# Altium PCB PCB1.pcbdoc
Units mil, origin at the board's own origin, x right, y up, seen from the top; angles counter-clockwise.
Board outline 5257.68 x 6780 mil, 2 copper layers (Top Layer, Bottom Layer), stack 62.206 mil thick; 51 components, 52 nets, 242 pads, 96 vias.
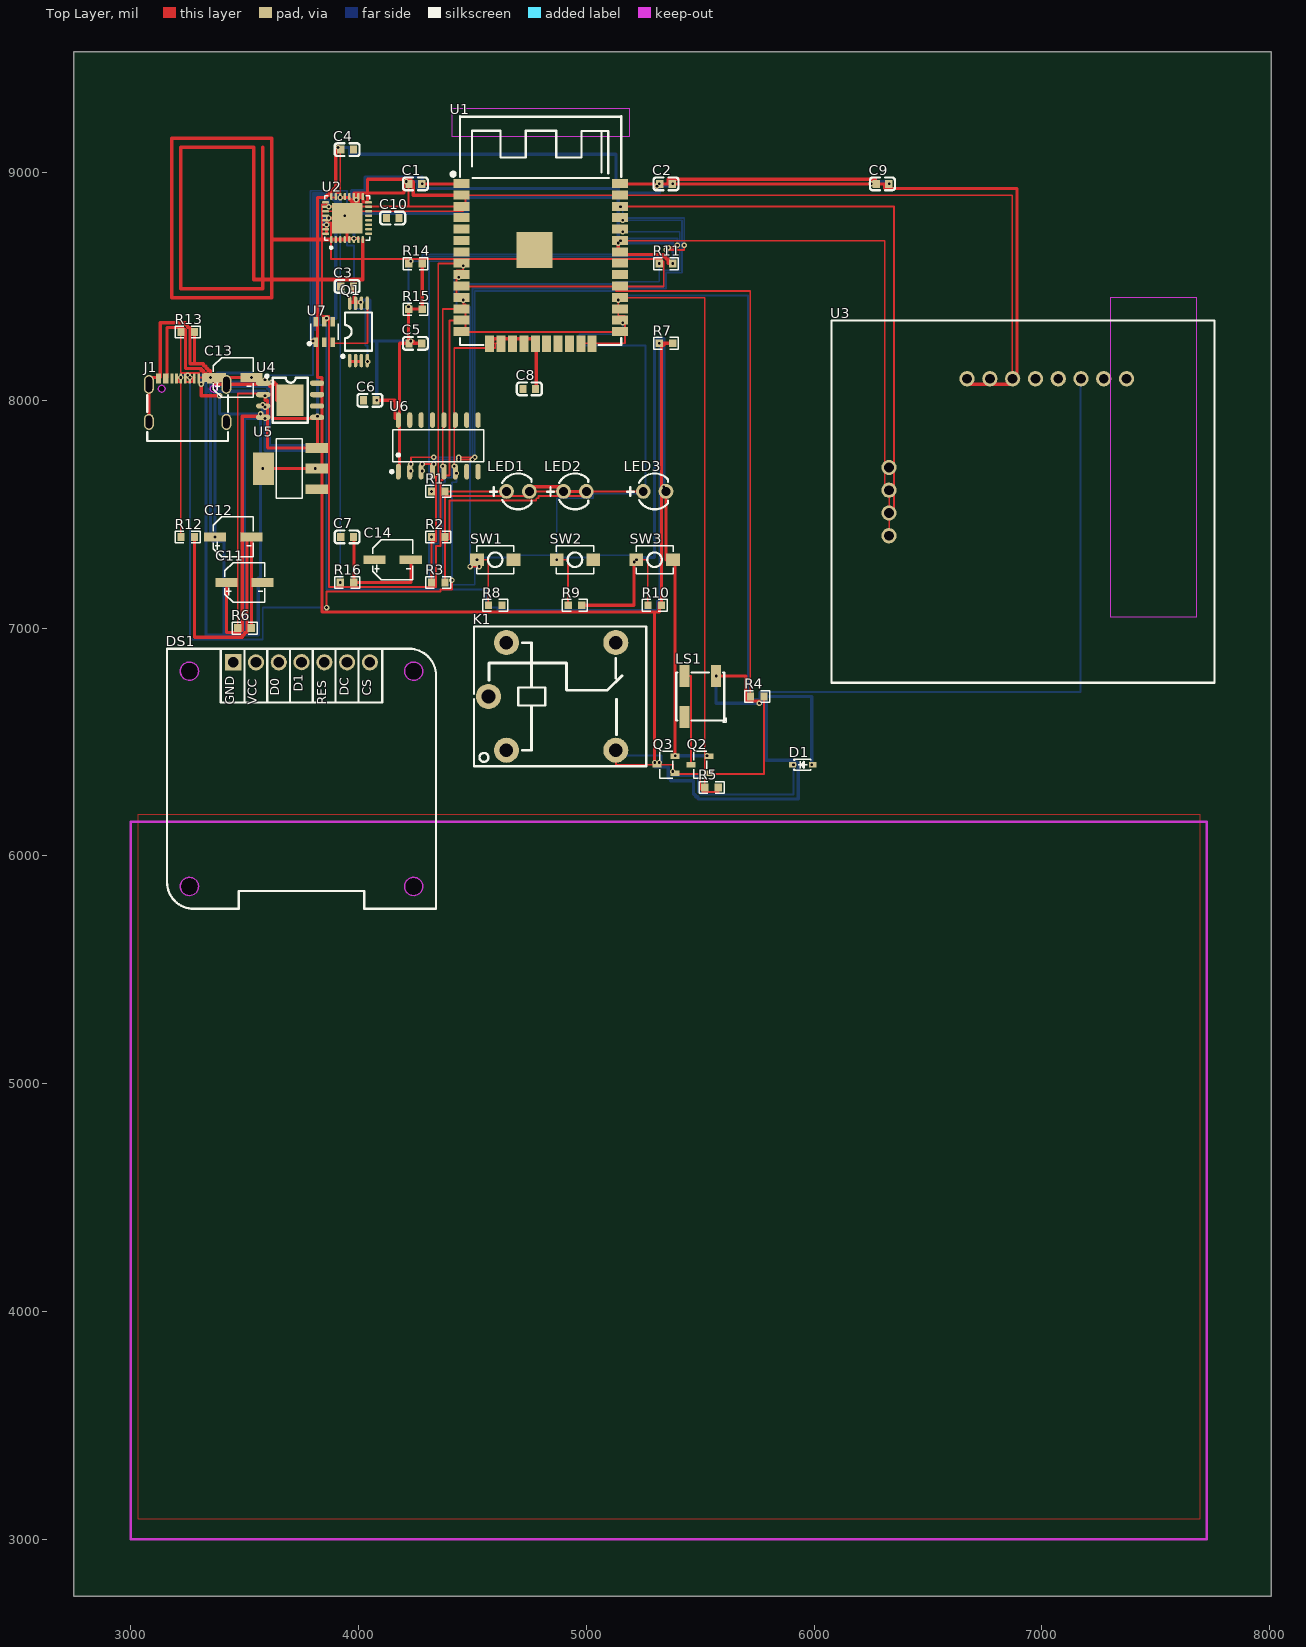
[diagram p0: Top Layer view]
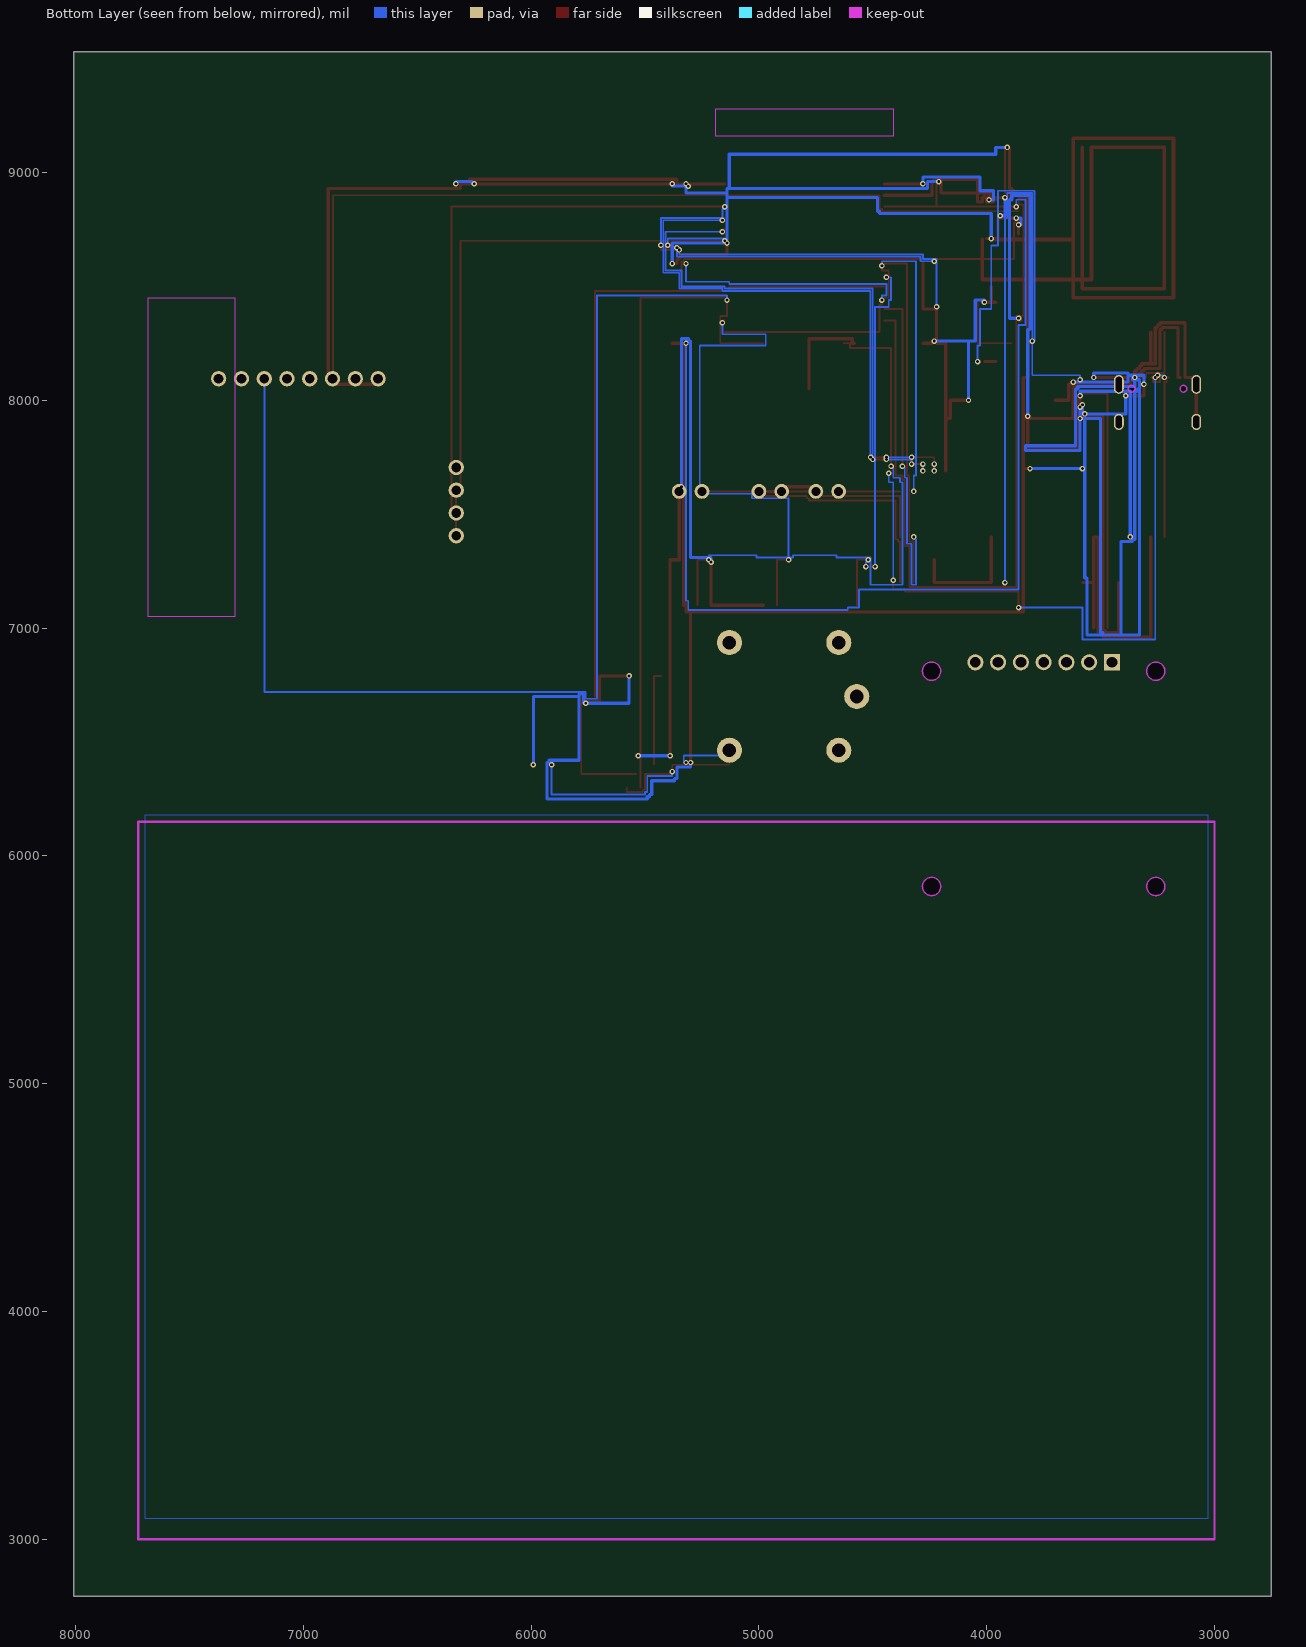
[diagram p1: Bottom Layer view, seen from below]

## Layer stack, top to bottom
Top Solder Mask Layer: solder mask 0.394, Dk 3.3
Top Layer: signal copper 1.379
Dielectric1: surface 59.449, FR4, Dk 4.5
Bottom Layer: signal copper 1.378
Bottom Solder Mask Layer: solder mask 0.394, Dk 3.3

## Board outline
8007.68,2750 2750,2750 2750,9530 8007.68,9530

## Design rules (kind name [scope] priority, off if disabled: settings)
BoardOutlineClearance copperThickness2oz_1 [All] p2 off: genericclearance=7.99 ignorepadtopadclearanceinfootprint=FALSE except(0: Arc-SplitContinuation Track-SplitContinuation SMDPad-SplitContinuation THPad-SplitContinuation Via-SplitContinuation Fill-SplitContinuation Region-SplitContinuation Poly-SplitContinuation Text-SplitContinuation Hole-SplitContinuation; 5.98: Arc-CutoutEdge SMDPad-CutoutEdge THPad-CutoutEdge Via-CutoutEdge Fill-CutoutEdge Region-CutoutEdge Text-CutoutEdge; 6.93: Hole-OutlineEdge Hole-CutoutEdge; 10: Poly-OutlineEdge Poly-CutoutEdge; 11.81: Arc-OutlineEdge Track-OutlineEdge SMDPad-OutlineEdge THPad-OutlineEdge Via-OutlineEdge Fill-OutlineEdge Region-OutlineEdge Text-OutlineEdge Track-CutoutEdge)
BoardOutlineClearance copperThickness1oz_1 [All] p4: genericclearance=4.02 ignorepadtopadclearanceinfootprint=FALSE except(0: Arc-SplitContinuation Track-SplitContinuation SMDPad-SplitContinuation THPad-SplitContinuation Via-SplitContinuation Fill-SplitContinuation Region-SplitContinuation Poly-SplitContinuation Text-SplitContinuation Hole-SplitContinuation; 6: SMDPad-CutoutEdge THPad-CutoutEdge Via-CutoutEdge Fill-CutoutEdge Region-CutoutEdge Text-CutoutEdge; 6.93: Hole-OutlineEdge Hole-CutoutEdge; 10: Poly-OutlineEdge Poly-CutoutEdge; 11.8: Arc-OutlineEdge Track-OutlineEdge SMDPad-OutlineEdge THPad-OutlineEdge Via-OutlineEdge Fill-OutlineEdge Region-OutlineEdge Text-OutlineEdge; 11.81: Arc-CutoutEdge Track-CutoutEdge)
Clearance copperThickness2oz [All] p1 off: gap=7.99 ignorepadtopadclearanceinfootprint=FALSE except(5.98: SMDPad-Track SMDPad-SMDPad THPad-Track SMDPad-THPad THPad-THPad Track-Via SMDPad-Via THPad-Via Via-Via Fill-Track Region-Track Fill-SMDPad Region-SMDPad Fill-THPad Region-THPad Fill-Via Region-Via Fill-Fill Fill-Region Region-Region Arc-Track Arc-SMDPad Arc-THPad Arc-Via Fill-Arc Region-Arc Arc-Arc Text-Track SMDPad-Text Text-THPad Text-Via Fill-Text Region-Text Arc-Text Text-Text; 6.93: Hole-Track Hole-SMDPad Hole-THPad Hole-Via Fill-Hole Region-Hole Hole-Arc Hole-Text; 10: Poly-Track Poly-SMDPad Poly-THPad Poly-Via Poly-Fill Poly-Region Poly-Poly Poly-Arc Poly-Text Poly-Hole)
Clearance copperThickness1oz [All] p3: gap=4.02 ignorepadtopadclearanceinfootprint=FALSE except(5.98: SMDPad-Track SMDPad-SMDPad THPad-Track SMDPad-THPad THPad-THPad Track-Via SMDPad-Via THPad-Via Via-Via Fill-Track Region-Track Fill-SMDPad Region-SMDPad Fill-THPad Region-THPad Fill-Via Region-Via Fill-Fill Fill-Region Region-Region; 6: Arc-Track Arc-SMDPad Arc-THPad Arc-Via Fill-Arc Region-Arc Arc-Arc Text-Track SMDPad-Text Text-THPad Text-Via Fill-Text Region-Text Arc-Text Text-Text; 6.93: Hole-Track Hole-SMDPad Hole-THPad Hole-Via Fill-Hole Region-Hole Hole-Arc Hole-Text; 10: Poly-Track Poly-SMDPad Poly-THPad Poly-Via Poly-Fill Poly-Region Poly-Poly Poly-Arc Poly-Text Poly-Hole)
Creepage creepage [All] p1: checkdistance=0 ignoreinternallayers=TRUE applytopolygonpour=TRUE
DiffPairsRouting differentialPair [All] p1: maxlimit=6 minlimit=6 mostfreqgap=6 toplayer_minwidth=5 toplayer_prefwidth=10 toplayer_maxwidth=100 toplayer_mingap=6 toplayer_prefgap=6 toplayer_maxgap=6 bottomlayer_minwidth=5 bottomlayer_prefwidth=10 bottomlayer_maxwidth=100 bottomlayer_mingap=6 bottomlayer_prefgap=6 bottomlayer_maxgap=6 maxuncoupledlength=10
HoleToHoleClearance otherClearance [All] p1: gap=11.81 allowstackedmicrovias=TRUE
Length netLength [All] p1: minlimit=0 maxlimit=0
MatchedLengths netLengthTolerance [All] p1: tolerance=1000
PasteMaskExpansion pasteMaskExpansion [All] p1: expansion=0
PlaneConnect innerPlane [All] p1: planeconnectstyle=Relief reliefexpansion=20 reliefentries=4 reliefconductorwidth=10 reliefairgap=10
PolygonConnect copperRegion [All] p1: connectstyle=Relief reliefconductorwidth=10 reliefentries=4 polygonreliefangle="90 Angle" airgapwidth=10 via.connectstyle=Relief via.reliefconductorwidth=10 via.reliefentries=4 via.polygonreliefangle="90 Angle" via.airgapwidth=10
RoutingVias viaSize [All] p1: holewidth=12.01 width=24.02 viastyle="Through Hole" minholewidth=11.81 minwidth=19.68 maxholewidth=248.03 maxwidth=393.7
SolderMaskExpansion solderMaskExpansion [IsVia] p1: expansion=-1000 istentingtop=TRUE
SolderMaskExpansion solderMaskExpansion [All] p2: expansion=2 istentingtop=FALSE
Width copperThickness2oz_2 [All] p1 off: maxlimit=100 minlimit=8 preferedwidth=10
Width copperThickness1oz_2 [All] p2: maxlimit=100 minlimit=5 preferedwidth=10

## Components (designator, comment, footprint, x,y, rotation, side; value= is the part's Value field where it differs from the comment)
C1 "100nF" C0603 4250,8950 r0 top
C2 "100nF" C0603 5350,8950 r0 top
C3 "100nF" C0603 3950,8500 r0 top
C4 "100nF" C0603 3950,9100 r0 top
C5 "100nF" C0603 4250,8250 r0 top
C6 "100nF" C0603 4050,8000 r0 top
C7 "100nF" C0603 3950,7400 r0 top
C8 "100nF" C0603 4750,8050 r0 top
C9 "100nF" C0603 6300,8950 r0 top
C10 "15pF" C0603 4150,8800 r0 top
C11 "CAP-SMD 4*5 10uF ±10% 16V" CAP-SMD_BD4.0-L4.3-W4.3-LS5.3-FD 3500,7200 r0 top
C12 "CAP-SMD 4*5 10uF ±10% 16V" CAP-SMD_BD4.0-L4.3-W4.3-LS5.3-FD 3450,7400 r0 top
C13 "CAP-SMD 4*5 10uF ±10% 16V" CAP-SMD_BD4.0-L4.3-W4.3-LS5.3-FD 3450,8100 r0 top
C14 "CAP-SMD 4*5 10uF ±10% 16V" CAP-SMD_BD4.0-L4.3-W4.3-LS5.3-FD 4150,7300 r0 top
D1 "SS14" SOD-323_L1.7-W1.3-LS2.6-RD-1 5950,6400 r0 top
DS1 "JX040102-1" OLED-TH_JX040101-1 3750,6850 r0 top
J1 "UCB11L69P16" TYPE-C-SMD_16P-UCB11L69P16 3250,8000 r0 top
K1 "SRD-03VDC-SL-C" RELAY-TH_SRD-XXVDC-XL-C 4850,6700 r0 top
LED1 "LED" LED-TH_BD4.0-P2.54-FD_RED 4700,7600 r0 top
LED2 "LED" LED-TH_BD4.0-P2.54-FD_RED 4950,7600 r0 top
LED3 "LED" LED-TH_BD4.0-P2.54-FD_RED 5300,7600 r0 top
LS1 "BEEP_SMT" BUZ-SMD_3P-L5.2-W5.2-P3.50-BR 5500,6700 r0 top
Q1 "FS8205A" TSSOP-8_L4.4-W3.0-P0.65-LS6.4-BL-2 4000,8300 r0 top
Q2 "S8050" SOT-23-3_L2.9-W1.3-P1.90-LS2.4-BR 5500,6400 r0 top
Q3 "S8050" SOT-23-3_L2.9-W1.3-P1.90-LS2.4-BR 5350,6400 r0 top
R1 "1k" R0603 4350,7600 r0 top
R2 "1k" R0603 4350,7400 r0 top
R3 "1k" R0603 4350,7200 r0 top
R4 "1k" R0603 5750,6700 r0 top
R5 "1k" R0603 5550,6300 r0 top
R6 "10k" R0603 3500,7000 r0 top
R7 "10k" R0603 5350,8250 r0 top
R8 "10k" R0603 4600,7100 r0 top
R9 "10k" R0603 4950,7100 r0 top
R10 "10k" R0603 5300,7100 r0 top
R11 "10k" R0603 5350,8600 r0 top
R12 "5.1k" R0603 3250,7400 r0 top
R13 "5.1k" R0603 3250,8300 r0 top
R14 "10k" R0603 4250,8600 r0 top
R15 "10k" R0603 4250,8400 r0 top
R16 "10k" R0603 3950,7200 r0 top
SW1 "轻触按键3*4*H" SW-SMD_L4.0-W2.9-LS5.0 4600,7300 r0 top
SW2 "轻触按键3*4*H" SW-SMD_L4.0-W2.9-LS5.0 4950,7300 r0 top
SW3 "轻触按键3*4*H" SW-SMD_L4.0-W2.9-LS5.0 5300,7300 r0 top
U1 "ESP32-WROOM-32" WIFIM-SMD_ESP-WROOM-32 4800,8600 r0 top
U2 "13.56MHz" QFN-32_L5.0-W5.0-P0.50-BL-EP3.4 3950,8800 r0 top
U3 "PN532 NFC RFID Module v4" COMM-TH_L42.7-W40.4_PN532_NFC_RFID 6850,7750 r0 top
U4 "TP4056X-42-ESOP8" SOP-8_L4.9-W3.9-P1.27-LS6.0-TL-EP 3700,8000 r0 top
U5 "AMS1117-3.3V" SOT-223-3_L6.5-W3.4-P2.30-LS7.0-BR 3700,7700 r0 top
U6 "CH340C" SOP-16_L10.0-W3.9-P1.27-LS6.0-BL 4350,7800 r0 top
U7 "DW01" SOT-23-6_L2.9-W1.6-P0.95-LS2.8-BL 3850,8300 r0 top

## Footprints (in the part's own frame and the unit in brackets; to place one, negate y for a bottom-side part, rotate by r counter-clockwise, add the part's x,y. Pads: shape width x height; smd on the part's side, far side on the other; paste and mask are expansions set on the pad)
BUZ-SMD_3P-L5.2-W5.2-P3.50-BR [mm]
  rect 1.12x2.425 smd: 1(1.75,2.288) 2(-1.75,2.288) 3(-1.75,-2.288)
  silkscreen extent -2.68,-2.9 2.9,2.68
C0603 [mm]
  rect 0.8x0.9 smd: 1(-0.7,0) 2(0.7,0)
  silkscreen extent -1.39,-0.71 1.39,0.71
CAP-SMD_BD4.0-L4.3-W4.3-LS5.3-FD [mm]
  rect 2.46x0.98 smd: 1(-2.02,0) 2(2.02,0)
  silkscreen extent -2.23,-2.23 2.23,2.23
COMM-TH_L42.7-W40.4_PN532_NFC_RFID [mm]
  round 1.7 hole 1.1: 1(-4.535,8.755) 2(-1.995,8.755) 3(0.545,8.755) 4(3.085,8.755) 5(5.625,8.755) 6(8.165,8.755) 7(10.705,8.755) 8(13.245,8.755) 9(-13.245,-1.135) 10(-13.245,-3.675) 11(-13.245,-6.215) 12(-13.245,-8.755)
  silkscreen extent -19.64,-25.14 23.05,15.25
LED-TH_BD4.0-P2.54-FD_RED [mil]
  round 65 hole 39.37: 1(-50,0) 2(50,0)
  silkscreen extent -122,-79 59,79
OLED-TH_JX040101-1 [mm]
  rect 1.8x1.8 hole 1.2 paste+0 mask+0.05: 1(-7.619,0.001)
  round 1.8 hole 1.2 paste+0 mask+0.05: 2(-5.079,-0.004) 3(-2.539,-0.004) 4(0.001,0.004) 5(2.539,-0.001) 6(5.079,-0.001) 7(7.619,-0.004)
  Board Outline Layer circle w0.003: c-12.501,-24.997 r1.016
  Board Outline Layer circle w0.003: c12.498,-24.997 r1.016
  Board Outline Layer circle w0.003: c12.498,-0.997 r1.016
  Board Outline Layer circle w0.003: c-12.501,-0.997 r1.016
  Board Outline Layer region: -11.485,-24.997 -11.585,-25.438 -11.867,-25.792 -12.275,-25.988 -12.727,-25.988 -13.134,-25.792 -13.416,-25.438 -13.517,-24.997 -13.517,-24.997 -13.416,-24.557 -13.134,-24.203 -12.727,-24.007 -12.275,-24.007 -11.867,-24.203 -11.585,-24.557 -11.485,-24.997
  Board Outline Layer region: -11.485,-24.997 -11.494,-25.136 -11.522,-25.272 -11.569,-25.402 -11.633,-25.525 -11.712,-25.639 -11.807,-25.74 -11.915,-25.827 -12.033,-25.9 -12.16,-25.955 -12.294,-25.992 -12.431,-26.011 -12.57,-26.011 -12.707,-25.992 -12.841,-25.955 -12.968,-25.9 -13.087,-25.827 -13.194,-25.74 -13.289,-25.639 -13.369,-25.525 -13.432,-25.402 -13.479,-25.272 -13.507,-25.136 -13.517,-24.997 -13.507,-24.859 -13.479,-24.723 -13.432,-24.593 -13.369,-24.47 -13.289,-24.356 -13.194,-24.255 -13.087,-24.167 -12.968,-24.095 -12.841,-24.04 -12.707,-24.003 -12.57,-23.984 -12.431,-23.984 -12.294,-24.003 -12.16,-24.04 -12.033,-24.095 -11.915,-24.167 -11.807,-24.255 -11.712,-24.356 -11.633,-24.47 -11.569,-24.593 -11.522,-24.723 -11.494,-24.859
  Board Outline Layer region: 13.514,-24.997 13.413,-25.438 13.132,-25.792 12.724,-25.988 12.272,-25.988 11.865,-25.792 11.583,-25.438 11.482,-24.997 11.482,-24.997 11.583,-24.557 11.865,-24.203 12.272,-24.007 12.724,-24.007 13.132,-24.203 13.413,-24.557 13.514,-24.997
  Board Outline Layer region: 13.514,-24.997 13.505,-25.136 13.476,-25.272 13.43,-25.402 13.366,-25.525 13.286,-25.639 13.192,-25.74 13.084,-25.827 12.965,-25.9 12.838,-25.955 12.705,-25.992 12.567,-26.011 12.429,-26.011 12.291,-25.992 12.158,-25.955 12.031,-25.9 11.912,-25.827 11.805,-25.74 11.71,-25.639 11.63,-25.525 11.566,-25.402 11.52,-25.272 11.492,-25.136 11.482,-24.997 11.492,-24.859 11.52,-24.723 11.566,-24.593 11.63,-24.47 11.71,-24.356 11.805,-24.255 11.912,-24.167 12.031,-24.095 12.158,-24.04 12.291,-24.003 12.429,-23.984 12.567,-23.984 12.705,-24.003 12.838,-24.04 12.965,-24.095 13.084,-24.167 13.192,-24.255 13.286,-24.356 13.366,-24.47 13.43,-24.593 13.476,-24.723 13.505,-24.859
  Board Outline Layer region: 13.514,-0.997 13.413,-1.438 13.132,-1.791 12.724,-1.987 12.272,-1.987 11.865,-1.791 11.583,-1.438 11.482,-0.997 11.482,-0.997 11.583,-0.556 11.865,-0.203 12.272,-0.006 12.724,-0.006 13.132,-0.203 13.413,-0.556 13.514,-0.997
  Board Outline Layer region: 13.514,-0.997 13.505,-1.135 13.476,-1.271 13.43,-1.402 13.366,-1.525 13.286,-1.638 13.192,-1.739 13.084,-1.827 12.965,-1.899 12.838,-1.954 12.705,-1.992 12.567,-2.011 12.429,-2.011 12.291,-1.992 12.158,-1.954 12.031,-1.899 11.912,-1.827 11.805,-1.739 11.71,-1.638 11.63,-1.525 11.566,-1.402 11.52,-1.271 11.492,-1.135 11.482,-0.997 11.492,-0.859 11.52,-0.723 11.566,-0.592 11.63,-0.469 11.71,-0.356 11.805,-0.254 11.912,-0.167 12.031,-0.095 12.158,-0.04 12.291,-0.002 12.429,0.017 12.567,0.017 12.705,-0.002 12.838,-0.04 12.965,-0.095 13.084,-0.167 13.192,-0.254 13.286,-0.356 13.366,-0.469 13.43,-0.592 13.476,-0.723 13.505,-0.859
  Board Outline Layer region: -11.485,-0.997 -11.585,-1.438 -11.867,-1.791 -12.275,-1.987 -12.727,-1.987 -13.134,-1.791 -13.416,-1.438 -13.517,-0.997 -13.517,-0.997 -13.416,-0.556 -13.134,-0.203 -12.727,-0.006 -12.275,-0.006 -11.867,-0.203 -11.585,-0.556 -11.485,-0.997
  Board Outline Layer region: -11.485,-0.997 -11.494,-1.135 -11.522,-1.271 -11.569,-1.402 -11.633,-1.525 -11.712,-1.638 -11.807,-1.739 -11.915,-1.827 -12.033,-1.899 -12.16,-1.954 -12.294,-1.992 -12.431,-2.011 -12.57,-2.011 -12.707,-1.992 -12.841,-1.954 -12.968,-1.899 -13.087,-1.827 -13.194,-1.739 -13.289,-1.638 -13.369,-1.525 -13.432,-1.402 -13.479,-1.271 -13.507,-1.135 -13.517,-0.997 -13.507,-0.859 -13.479,-0.723 -13.432,-0.592 -13.369,-0.469 -13.289,-0.356 -13.194,-0.254 -13.087,-0.167 -12.968,-0.095 -12.841,-0.04 -12.707,-0.002 -12.57,0.017 -12.431,0.017 -12.294,-0.002 -12.16,-0.04 -12.033,-0.095 -11.915,-0.167 -11.807,-0.254 -11.712,-0.356 -11.633,-0.469 -11.569,-0.592 -11.522,-0.723 -11.494,-0.859
  Multi-Layer board cut-out: -11.485,-24.997 -11.585,-25.438 -11.867,-25.792 -12.275,-25.988 -12.727,-25.988 -13.134,-25.792 -13.416,-25.438 -13.517,-24.997 -13.517,-24.997 -13.416,-24.557 -13.134,-24.203 -12.727,-24.007 -12.275,-24.007 -11.867,-24.203 -11.585,-24.557 -11.485,-24.997
  Multi-Layer board cut-out: 13.514,-24.997 13.413,-25.438 13.132,-25.792 12.724,-25.988 12.272,-25.988 11.865,-25.792 11.583,-25.438 11.482,-24.997 11.482,-24.997 11.583,-24.557 11.865,-24.203 12.272,-24.007 12.724,-24.007 13.132,-24.203 13.413,-24.557 13.514,-24.997
  Multi-Layer board cut-out: 13.514,-0.997 13.413,-1.438 13.132,-1.791 12.724,-1.987 12.272,-1.987 11.865,-1.791 11.583,-1.438 11.482,-0.997 11.482,-0.997 11.583,-0.556 11.865,-0.203 12.272,-0.006 12.724,-0.006 13.132,-0.203 13.413,-0.556 13.514,-0.997
  Multi-Layer board cut-out: -11.485,-0.997 -11.585,-1.438 -11.867,-1.791 -12.275,-1.987 -12.727,-1.987 -13.134,-1.791 -13.416,-1.438 -13.517,-0.997 -13.517,-0.997 -13.416,-0.556 -13.134,-0.203 -12.727,-0.006 -12.275,-0.006 -11.867,-0.203 -11.585,-0.556 -11.485,-0.997
  silkscreen extent -15,-27.5 15,1.5
QFN-32_L5.0-W5.0-P0.50-BL-EP3.4 [mm]
  oval 0.28x0.8 smd paste+0 mask+0.05: 1(-1.75,-2.4) 2(-1.25,-2.4) 3(-0.75,-2.4) 4(-0.25,-2.4) 5(0.25,-2.4) 6(0.75,-2.4) 7(1.25,-2.4) 8(1.75,-2.4) 17(1.75,2.4) 18(1.25,2.4) 19(0.75,2.4) 20(0.25,2.4) 21(-0.25,2.4) 22(-0.75,2.4) 23(-1.25,2.4) 24(-1.75,2.4)
  oval 0.8x0.28 smd paste+0 mask+0.05: 9(2.4,-1.75) 10(2.4,-1.25) 11(2.4,-0.75) 12(2.4,-0.25) 13(2.4,0.25) 14(2.4,0.75) 15(2.4,1.25) 16(2.4,1.75) 25(-2.4,1.75) 26(-2.4,1.25) 27(-2.4,0.75) 28(-2.4,0.25) 29(-2.4,-0.25) 30(-2.4,-0.75) 31(-2.4,-1.25) 32(-2.4,-1.75)
  rect 3.4x3.4 smd paste+0 mask+0.05: 33(0,0)
  silkscreen extent -2.5,-3.43 2.5,2.5
R0603 [mil]
  rect 31.75x34.02 smd paste-3937.01 mask+2: 1(-29.66,0) 2(29.66,0)
  silkscreen extent -55,-26 55,26
RELAY-TH_SRD-XXVDC-XL-C [mil]
  round 110 hole 60: 1(-200.79,-236.22) 2(279.52,-236.2) 3(279.53,236.2) 4(-200.79,236.22) 5(-279.53,0)
  silkscreen extent -342,-307 413,307
SOD-323_L1.7-W1.3-LS2.6-RD-1 [mm]
  rect 0.83x0.63 smd paste+0 mask+0.05: 1(-1.14,0) 2(1.14,0)
  silkscreen extent -1.02,-0.64 0.89,0.64
SOP-8_L4.9-W3.9-P1.27-LS6.0-TL-EP [mm]
  oval 1.6x0.6 smd: 1(-3,1.905) 2(-3,0.635) 3(-3,-0.635) 4(-3,-1.905) 5(3,-1.905) 6(3,-0.635) 7(3,0.635) 8(3,1.905)
  rect 3x3.5 smd: 9(0,0)
  silkscreen extent -2.74,-2.5 1.95,2.84
SOP-16_L10.0-W3.9-P1.27-LS6.0-BL [mm]
  oval 0.56x1.745 smd: 1(-4.445,-2.872) 2(-3.175,-2.872) 3(-1.905,-2.872) 4(-0.635,-2.872) 5(0.635,-2.872) 6(1.905,-2.872) 7(3.175,-2.872) 8(4.445,-2.872) 9(4.445,2.872) 10(3.175,2.872) 11(1.905,2.872) 12(0.635,2.872) 13(-0.635,2.872) 14(-1.905,2.872) 15(-3.175,2.872) 16(-4.445,2.872)
  silkscreen extent -5.33,-3.02 5.08,1.77
SOT-23-3_L2.9-W1.3-P1.90-LS2.4-BR [mm]
  rect 1x0.65 smd: 1(1,-0.95) 2(1,0.95) 3(-1,0)
  silkscreen extent -0.73,-1.53 0.73,1.53
SOT-23-6_L2.9-W1.6-P0.95-LS2.8-BL [mil]
  rect 20.95x42.2 smd: 1(-37.4,-45.24) 2(0,-45.24) 3(37.4,-45.24) 4(37.4,45.24) 5(0,45.24) 6(-37.4,45.24)
  silkscreen extent -72,-57 61,35
SOT-223-3_L6.5-W3.4-P2.30-LS7.0-BR [mm]
  rect 2.5x1.1 smd: 1(2.97,-2.3) 2(2.97,0) 3(2.97,2.3)
  rect 2.34x3.6 smd: 4(-2.97,0)
  silkscreen extent -1.57,-3.33 1.37,3.33
SW-SMD_L4.0-W2.9-LS5.0 [mm]
  rect 1.53x1.36 smd: 1(-2.035,0) 2(2.035,0)
  silkscreen extent -2.08,-1.58 2.08,1.58
TSSOP-8_L4.4-W3.0-P0.65-LS6.4-BL-2 [mm]
  oval 0.4x1.5 smd: 1(-0.975,-3.2) 2(-0.325,-3.2) 3(0.325,-3.2) 4(0.975,-3.2) 5(0.975,3.2) 6(0.325,3.2) 7(-0.325,3.2) 8(-0.975,3.2)
  silkscreen extent -1.89,-2.87 1.5,2.16
TYPE-C-SMD_16P-UCB11L69P16 [mm]
  oval 1.1x1.8 hole 0.7 slot 1.4 at 90 deg: 1(-4.32,-2.416) 1(4.32,-2.416)
  oval 1.1x2.1 hole 0.7 slot 1.7 at 90 deg: 1(-4.32,1.764) 1(4.32,1.764)
  rect 0.3x1.14 smd paste-100 mask+0.051: A1(-3.4,2.415) A4(-2.6,2.415) A5(-1.25,2.415) A6(-0.25,2.415) A7(0.25,2.415) A8(1.25,2.416) A9(2.6,2.415) A12(3.4,2.415) B1(3.1,2.415) B4(2.3,2.415) B5(1.75,2.415) B6(0.75,2.415) B7(-0.75,2.415) B8(-1.75,2.416) B9(-2.3,2.415) B12(-3.1,2.415)
  Board Outline Layer circle w0.003: c-2.89,1.285 r0.375
  Board Outline Layer circle w0.003: c2.89,1.285 r0.375
  Board Outline Layer region: -2.515,1.285 -2.552,1.122 -2.656,0.991 -2.807,0.919 -2.973,0.919 -3.124,0.991 -3.228,1.122 -3.265,1.285 -3.265,1.285 -3.228,1.447 -3.124,1.578 -2.973,1.65 -2.807,1.65 -2.656,1.578 -2.552,1.447 -2.515,1.285
  Board Outline Layer region: -2.515,1.285 -2.524,1.201 -2.552,1.122 -2.597,1.051 -2.656,0.991 -2.727,0.947 -2.807,0.919 -2.89,0.91 -2.973,0.919 -3.053,0.947 -3.124,0.991 -3.183,1.051 -3.228,1.122 -3.256,1.201 -3.265,1.285 -3.256,1.368 -3.228,1.447 -3.183,1.518 -3.124,1.578 -3.053,1.622 -2.973,1.65 -2.89,1.66 -2.807,1.65 -2.727,1.622 -2.656,1.578 -2.597,1.518 -2.552,1.447 -2.524,1.368
  Board Outline Layer region: 3.265,1.285 3.228,1.122 3.124,0.991 2.973,0.919 2.807,0.919 2.656,0.991 2.552,1.122 2.515,1.285 2.515,1.285 2.552,1.447 2.656,1.578 2.807,1.65 2.973,1.65 3.124,1.578 3.228,1.447 3.265,1.285
  Board Outline Layer region: 3.265,1.285 3.256,1.201 3.228,1.122 3.183,1.051 3.124,0.991 3.053,0.947 2.973,0.919 2.89,0.91 2.807,0.919 2.727,0.947 2.656,0.991 2.597,1.051 2.552,1.122 2.524,1.201 2.515,1.285 2.524,1.368 2.552,1.447 2.597,1.518 2.656,1.578 2.727,1.622 2.807,1.65 2.89,1.66 2.973,1.65 3.053,1.622 3.124,1.578 3.183,1.518 3.228,1.447 3.256,1.368
  Multi-Layer board cut-out: -2.515,1.285 -2.552,1.122 -2.656,0.991 -2.807,0.919 -2.973,0.919 -3.124,0.991 -3.228,1.122 -3.265,1.285 -3.265,1.285 -3.228,1.447 -3.124,1.578 -2.973,1.65 -2.807,1.65 -2.656,1.578 -2.552,1.447 -2.515,1.285
  Multi-Layer board cut-out: 3.265,1.285 3.228,1.122 3.124,0.991 2.973,0.919 2.807,0.919 2.656,0.991 2.552,1.122 2.515,1.285 2.515,1.285 2.552,1.447 2.656,1.578 2.807,1.65 2.973,1.65 3.124,1.578 3.228,1.447 3.265,1.285
  silkscreen extent -4.5,-4.54 4.5,0.58
WIFIM-SMD_ESP-WROOM-32 [mm]
  rect 1.8x1.001 smd: 1(-8.851,8.93) 2(-8.851,7.66) 3(-8.851,6.39) 4(-8.851,5.12) 5(-8.851,3.85) 6(-8.851,2.58) 7(-8.851,1.31) 8(-8.851,0.04) 9(-8.851,-1.23) 10(-8.851,-2.5) 11(-8.851,-3.77) 12(-8.851,-5.04) 13(-8.851,-6.31) 14(-8.851,-7.58) 25(8.851,-7.58) 26(8.851,-6.31) 27(8.851,-5.04) 28(8.851,-3.77) 29(8.851,-2.5) 30(8.851,-1.23) 31(8.851,0.04) 32(8.851,1.31) 33(8.851,2.58) 34(8.851,3.85) 35(8.851,5.12) 36(8.851,6.39) 37(8.851,7.66) 38(8.851,8.93)
  rect 1.001x1.8 smd: 15(-5.69,-8.93) 16(-4.42,-8.93) 17(-3.15,-8.93) 18(-1.88,-8.93) 19(-0.61,-8.93) 20(0.66,-8.93) 21(1.93,-8.93) 22(3.2,-8.93) 23(4.47,-8.93) 24(5.74,-8.93)
  rect 4x4 smd: 39(-0.7,1.52)
  silkscreen extent -9.97,-9.08 8.99,16.42

## Via types
v1: diameter 24, hole 12, Top Layer to Bottom Layer, 96 vias

## Nets (pads, with @x,y where several pads share a name; then routed paths per layer and width w, separated by ;. In a path a pad name is that pad's centre, name@x,y a point inside that pad or via, vN(x,y) a via of type N, cw(c..) or ccw(c..) an arc to the next point about the centre after c; other vN are vias at no path point)
+3V3: C2.1 C3.1 C5.1 C8.1 C9.1 C13.1 C14.1 D1.2 K1.1 LS1.1 R7.2 R8.2 R9.2 R10.2 R11.2 R14.2 R15.2 U1.2 U2.6 U2.16 U2.17 U2.19 U3.1 U5.2 U5.4 U6.16 | length 20780
  Top Layer w14: C13.1@3370,8100 3370,8070 3610,8070 3610,8060 3620,8060 3620,7920 3840,7920 ; v1(3580,7700) U5.2@3840,7700 ; v1(3910,9110) 3900,9110 3900,8930 3890,8930 3890,8920 3880,8920 3880,8910 3870,8910 3870,8900 3860,8900 3860,8890 3820,8890 3820,8100 3840,8100 3840,7920 ; U6.16@4180,7910 4180,8250 4220,8250 4220,8400 4280,8400 R14.2@4280,8600 ; v1(4210,8960) 4200,8960 4200,8910 4040,8910 ; U1.2@4450,8900 4240,8900 4240,8960 4230,8960 4230,8970 4040,8970 4040,8910 ; R9.2@4980,7100 5210,7100 v1(5210,7290) ; v1(5140,8690) 5140,8640 5340,8640 5340,8630 5350,8630 5350,8620 5360,8620 5360,8600 v1(5380,8600) ; v1(5300,6410) 5300,7070 ; v1(5320,8950) 5360,8950 5360,8970 6270,8970 6270,8950 6310,8950 6310,8930 6890,8930 6890,8080 6880,8080 6880,8070 6670,8070 U3.1@6670,8090 ; v1(5340,7620) v1@5330,7620 ; R7.2@5380,8250 5340,8250 5340,8240 5330,8240 v1@5330,7620 ; v1(5570,6790) 5700,6790 5700,6680 5760,6680 v1(5760,6670) ; U5.2@3840,7700 3840,7070 5300,7070 ; U5.2@3840,7700 3840,7920 ; 3990,8910 3990,8890 3980,8890 3980,8910 3990,8910 ; 3990,8910 4010,8910 ; 4010,8910 4010,8890 4020,8890 4020,8870 4040,8870 4040,8910 ; 4010,8910 4040,8910 ; 5300,7070 5320,7070 R10.2@5320,7100 ; R10.2@5320,7100 5330,7100 R10.2@5330,7110 ; R10.2@5320,7100 5320,7110 R10.2@5330,7110 ; R10.2@5330,7110 v1@5330,7620
  Bottom Layer w14: v1(3580,7700) v1(3810,7700) ; v1(3910,9110) 3960,9110 3960,9080 5130,9080 5130,8930 ; v1(3980,8710) 3980,8820 4470,8820 4470,8830 4480,8830 4480,8890 5140,8890 ; v1(4210,8960) 4260,8960 4260,8930 5130,8930 ; v1(5210,7290) 5210,7310 5300,7310 5300,8260 5310,8260 5310,8270 5340,8270 v1(5340,7620) ; v1(5300,6410) 5300,6390 5360,6390 5360,6340 5370,6340 5370,6330 5470,6330 5470,6270 5480,6270 5480,6260 5490,6260 5490,6250 5930,6250 5930,6410 5920,6410 5920,6420 5790,6420 5790,6700 ; v1(5320,8950) 5320,8910 5140,8910 ; v1(5380,8600) 5380,8690 v1(5140,8690) 5140,8890 ; v1(5570,6790) 5570,6670 5770,6670 5770,6710 5790,6710 5790,6700 ; v1(5990,6400) 5990,6700 5790,6700 ; 5130,8930 5140,8930 5140,8910 ; 5140,8890 5140,8910
ANT1: C10.2 U2.5 U2.8 | length 5774.3
  Top Layer w16: 3580,9110 3580,8530 ; U2.5@3959.9,8705.5 3620,8705.5 ; U2.8 4018.9,8530 3620,8530 ; 3580,8530 3540,8530 3540,9110 3220,9110 3220,8490 3580,8490 3580,8530 ; 3580,8530 3620,8530 ; 3620,8530 3620,8450 3180,8450 3180,9150 3620,9150 3620,8705.5 ; 3620,8530 3620,8705.5
ANT_RX: C10.1 U2.23
BAT_GND: Q1.1 Q1.2 Q1.3 U7.6 | length 50
  Top Layer w14: Q1.1@3960,8170 Q1.3@4010,8170
BOOT: R11.1 U1.25 | length 1890
  Top Layer w8: v1(4460,8440) 4460,8420 4470,8420 4470,8300 U1.25@5150,8300
  Bottom Layer w8: v1(4460,8440) 4460,8460 4440,8460 4440,8510 5130,8510 5130,8520 5320,8520 v1(5320,8600)
BUZ: R4.1 U1.10 | length 3070
  Top Layer w8: U1.10@4450,8500 5130,8500 5130,8480 5720,8480 R4.1@5720,6700
BUZ_C: LS1.2 Q2.3 | length 420
  Top Layer w8: LS1.2@5430,6790 5460,6790 Q2.3@5460,6400
CC1: J1.A5 R12.1 | length 720
  Top Layer w8: J1.A5@3200,8100 3210,8100 3210,8080 3220,8080 R12.1@3220,7400
CC2: J1.B5 R13.1 | length 300
  Top Layer w8: R13.1@3220,8300 3220,8120 3300,8120 3300,8100 J1.B5@3320,8100
CE: U4.8
CH_V3: C7.1 U6.4
CHRG: U4.7
CS: U7.2
EN: C1.1 R7.1 U1.3 | length 5210
  Top Layer w8: v1(3870,8850) 4220,8850 ; C1.1@4220,8950 4220,8850 ; U1.3@4450,8850 4220,8850
  Bottom Layer w8: v1(3870,8850) 3870,8880 3830,8880 3830,8330 3860,8330 3860,7170 4560,7170 4560,7090 4610,7090 4610,7080 5310,7080 5310,7120 5320,7120 v1(5320,8250)
GND: C1.2 C2.2 C3.2 C4.2 C5.2 C6.2 C7.2 C8.2 C9.2 C11.2 C12.2 C13.2 C14.2 J1.1@3079.92,7904.9 J1.A1 J1.A12 J1.B1 J1.B12 LED1.2 LED2.2 LED3.2 Q1.6 Q1.7 Q1.8 Q2.2 Q3.2 R6.2 R12.2 R13.2 R16.2 SW1.2 SW2.2 SW3.2 U1.1 U1.15 U1.38 U1.39 U2.7 U2.18 U2.22 U2.30 U2.32 U2.33 U3.2 U3.10 U4.3 U4.9 U5.1 U6.1 | length 14510
  Top Layer w14: J1.1@3080,7900 3080,8100 3130,8100 3130,8340 3240,8340 3240,8330 3250,8330 3250,8320 3260,8320 3260,8160 3280,8160 ; R12.2@3280,7400 3280,6960 3490,6960 3490,6970 3500,6970 3500,6980 3510,6980 3510,7400 3530,7400 3530,7200 ; R13.2@3280,8300 3280,8160 ; R6.2@3530,7000 3530,7200 ; v1(3530,8100) 3360,8100 3360,8110 3350,8110 3350,8130 3340,8130 3340,8140 3330,8140 3330,8150 3320,8150 3320,8160 3280,8160 ; C11.2@3580,7200 3530,7200 ; v1(3580,7980) 3590,7980 v1(3590,7970) ; v1(3620,8080) 3630,8080 3630,8070 3640,8070 3640,8000 U4.9 ; U2.32@3860,8730 v1(3860,8770) ; v1(3870,8800) U2.33@3940,8800 ; v1(3920,8890) 3960,8890 3960,8880 3970,8880 3970,8870 4000,8870 4000,8890 3990,8890 v1(3990,8880) ; v1(3940,8810) U2.33@3940,8800 ; Q1.8@3960,8430 Q1.7@3980,8430 ; C7.2@3980,7400 3980,7200 4230,7200 C14.2@4230,7300 ; C3.2@3980,8500 Q1.7@3980,8430 ; U2.7@4000,8710 3950,8710 U2.33 U2.33@3940,8800 ; v1(4010,8430) Q1.7@3980,8430 ; v1(4080,8000) 4160,8000 4160,7920 4180,7920 U6.1@4180,7690 ; v1(4230,8260) 4240,8260 4240,8250 C5.2@4280,8250 ; v1(4280,8950) U1.1@4450,8950 ; U1.15@4580,8250 4590,8250 4590,8270 4780,8270 C8.2@4780,8050 ; LED1.2 4750,7620 4910,7620 4910,7610 4920,7610 4920,7600 LED2.2 ; U1.38@5150,8950 5300,8950 5300,8940 v1(5310,8940) ; LED3.2 5350,7300 5380,7300 5390,7300 v1(5390,6440) ; v1(5380,8950) v1(6250,8950) ; v1(5530,6440) Q2.2@5540,6440
  Bottom Layer w14: v1(3530,8100) 3530,8120 3380,8120 3380,8110 ; v1(3580,7980) 3580,7940 3590,7940 ; v1(3590,7970) 3590,7940 ; v1(3620,8080) 3380,8080 3380,8110 ; v1(3860,8770) 3850,8770 3850,8800 v1(3870,8800) ; v1(3920,8890) 3920,8810 v1(3940,8810) ; v1(3990,8880) 3970,8880 3970,8920 4030,8920 4030,8980 4280,8980 v1(4280,8950) ; v1(4010,8430) 4010,8440 4050,8440 4050,8260 4080,8260 ; v1(4080,8000) 4080,8260 ; v1(4230,8260) 4080,8260 ; v1(5310,8940) 5380,8940 v1(5380,8950) ; v1(5390,6440) v1(5530,6440) ; v1(6250,8950) 6260,8950 6260,8960 6330,8960 v1(6330,8950) ; 3330,8050 3340,8050 3340,8040 3350,8040 3350,7390 3360,7390 3360,7380 3410,7380 3410,6970 ; 3330,8050 3330,6970 3410,6970 ; 3330,8050 3330,8090 3350,8090 ; 3350,8090 3350,8110 3360,8110 ; 3350,8090 3360,8090 3360,8110 ; 3360,8110 3380,8110 ; 3410,6970 3490,6970 ; 3490,6970 3490,6980 3500,6980 3500,7920 3570,7920 ; 3490,6970 3560,6970 3560,7220 3570,7220 3570,7920 ; 3570,7920 3590,7920 3590,7940
  other v1: 4230,8260
LED_G: R1.1 U1.11 | length 1380
  Top Layer w8: U1.11@4450,8450 4430,8450 4430,8570 4460,8570 v1(4460,8590)
  Bottom Layer w8: v1(4320,7600) 4320,7670 4310,7670 4310,8610 4460,8610 v1(4460,8590)
LED_R: R2.1 U1.12 | length 1570
  Top Layer w8: v1(4370,7710) 4370,8400 U1.12@4450,8400
  Bottom Layer w8: v1(4320,7400) 4320,7390 4310,7390 4310,7190 4330,7190 4330,7370 4350,7370 4350,7660 4360,7660 4360,7710 v1(4370,7710)
LED_S: R3.1 U1.8 | length 1530
  Top Layer w8: R3.1@4320,7200 4320,7380 4340,7380 4340,7670 4350,7670 4350,8600 U1.8@4450,8600
NC5V: U3.9
NLED1: LED1.1 R1.2 | length 270
  Top Layer w8: R1.2@4380,7600 LED1.1
NLED2: LED2.1 R2.2 | length 720
  Top Layer w8: R2.2@4380,7400 4380,7580 4770,7580 4770,7600 LED2.1
NLED3: LED3.1 R3.2 | length 1270
  Top Layer w8: R3.2@4380,7200 4380,7380 4390,7380 4390,7390 4400,7390 4400,7560 4780,7560 4780,7570 4790,7570 4790,7580 5020,7580 5020,7600 LED3.1
NQB2: Q2.1 R4.2 | length 580
  Top Layer w8: Q2.1@5540,6360 5780,6360 R4.2@5780,6700
NQB3: Q3.1 R5.2 | length 290
  Top Layer w8: Q3.1@5390,6360 5500,6360 5500,6290 5510,6290 5510,6280 5580,6280 R5.2@5580,6300
OC: Q1.5 U7.3 | length 330
  Top Layer w8: U7.3@3890,8250 4040,8250 Q1.5@4040,8430
OD: Q1.4 U7.1 | length 1690
  Top Layer w8: v1(3800,8260) 3800,8250 U7.1@3810,8250
  Bottom Layer w8: v1(3800,8260) 3790,8260 3790,8920 3950,8920 3950,8680 3980,8680 3980,8400 4030,8400 4030,8240 4040,8240 v1(4040,8170)
OSCIN: U2.1
PN_IRQ: U3.7
PN_RST: U3.8
PN_SS: U1.23 U3.6 | length 5630
  Top Layer w8: U1.23@4980,8250 5170,8250 5170,8370 5140,8370 v1(5140,8440)
  Bottom Layer w8: v1(5140,8440) 5140,8460 5710,8460 5710,6690 5760,6690 5760,6720 7170,6720 v1(7170,8090)
PROG: R6.1 U4.2 | length 1140
  Top Layer w8: R6.1@3470,7000 3470,8030 U4.2@3580,8030
RC_RST: U1.13 U2.25 | length 3490
  Top Layer w8: U2.25@3860,8870 3860,8860 3840,8860 3840,8370 3870,8370 3870,7180 4340,7180 4340,7360 4360,7360 4360,7650 4370,7650 4370,7670 4400,7670 4400,8350 U1.13@4450,8350
RC_SS: U1.29 U2.29 | length 1960
  Top Layer w8: U2.29@3860,8790 3860,8780 3880,8780 3880,8620 5330,8620 5330,8610 5340,8610 5340,8500 U1.29@5150,8500
RLY: R5.1 U1.28 | length 2520
  Top Layer w8: U1.28@5150,8450 5520,8450 R5.1@5520,6300
RLY_C: D1.1 K1.2 Q3.3 | length 1370
  Top Layer w8: v1(5130,6460) 5130,6400 Q3.3@5320,6400 ; v1(5320,6410) Q3.3@5320,6400 ; v1(5380,6370) 5380,6400 Q3.3@5320,6400
  Bottom Layer w8: v1(5130,6460) 5130,6440 5330,6440 5330,6410 v1(5320,6410) ; v1(5380,6370) 5380,6350 5490,6350 5490,6280 5500,6280 5500,6270 5910,6270 v1(5910,6400)
SCL: R15.1 U1.36 U3.12 | length 4600
  Top Layer w8: R15.1@4220,8400 v1(4220,8410) ; v1(5150,8850) 6350,8850 6350,7500 6340,7500 6340,7490 6330,7490 U3.12@6330,7410 ; v1(5350,8660) 5430,8660 v1(5430,8680)
  Bottom Layer w8: v1(4220,8410) 4220,8620 4280,8620 4280,8640 5350,8640 v1(5350,8660) ; v1(5150,8850) 5150,8840 5160,8840 5160,8800 5430,8800 v1(5430,8680)
SDA: R14.1 U1.33 U3.11 | length 3920
  Top Layer w8: R14.1@4220,8600 4230,8600 v1(4230,8610) ; v1(5150,8700) 6310,8700 6310,7590 6330,7590 U3.11@6330,7510 ; v1(5360,8670) 5400,8670 v1(5400,8680)
  Bottom Layer w8: v1(4230,8610) 4290,8610 4290,8630 5360,8630 v1(5360,8670) ; v1(5150,8700) 5150,8710 5400,8710 v1(5400,8680)
SPI_MISO: U1.31 U2.26 U3.4
SPI_MOSI: U1.37 U2.27 U3.3 | length 3890
  Top Layer w8: U2.27@3860,8830 4460,8830 4460,8840 4470,8840 4470,8900 6870,8900 U3.3@6870,8090
SPI_SCK: U1.30 U2.28 U3.5
STDBY: U4.6
SW1: R8.1 SW1.1 U1.9 | length 1710
  Top Layer w8: v1(4440,8540) 4440,8550 U1.9@4450,8550 ; v1(4490,7270) v1(4530,7270) ; v1(4520,7300) 4570,7300 R8.1@4570,7100
  Bottom Layer w8: v1(4440,8540) 4420,8540 4420,8440 4430,8440 4430,8410 4490,8410 v1(4490,7270) ; v1(4520,7300) 4520,7290 4530,7290 v1(4530,7270)
SW2: R9.1 SW2.1 U1.26 | length 2180
  Top Layer w8: v1(4870,7300) 4920,7300 R9.1@4920,7100 ; U1.26@5150,8350 5160,8350 v1(5160,8340)
  Bottom Layer w8: v1(4870,7300) 4870,7570 5030,7570 5030,7590 5260,7590 5260,8240 4970,8240 4970,8290 5160,8290 v1(5160,8340)
SW3: R10.1 SW3.1 U1.16 | length 2590
  Top Layer w8: v1(4420,7710) 4420,8230 4600,8230 4600,8250 U1.16@4630,8250 ; v1(5220,7300) 5270,7300 R10.1@5270,7100
  Bottom Layer w8: v1(4420,7710) 4410,7710 4410,7660 4380,7660 4380,7640 4370,7640 4370,7190 4510,7190 4510,7310 4660,7310 4660,7320 4850,7320 4850,7310 5010,7310 5010,7320 5220,7320 v1(5220,7300)
TEMP: R16.1 U4.1 | length 2880
  Top Layer w8: U4.1@3580,8080 3590,8080 v1(3590,8090)
  Bottom Layer w8: v1(3590,8090) 3590,8110 3800,8110 3800,8910 3910,8910 3910,8800 3920,8800 v1(3920,7200)
UART_RX: U1.34 U6.3 | length 2450
  Top Layer w8: v1(4280,7720) v1(4330,7720) ; v1(4440,7740) v1(4500,7740) ; U1.34@5150,8750 5160,8750 v1(5160,8740)
  Bottom Layer w8: v1(4280,7690) v1(4280,7720) ; v1(4330,7720) 4330,7740 v1(4440,7740) ; v1(4500,7740) 4500,8490 5150,8490 5150,8500 5340,8500 5340,8570 5410,8570 5410,8740 v1(5160,8740)
UART_TX: U1.35 U6.2 | length 2570
  Top Layer w8: v1(4230,7720) 4230,7750 v1(4330,7750) ; v1(4440,7750) v1(4510,7750) ; U1.35@5150,8800 5160,8800 v1(5160,8790)
  Bottom Layer w8: v1(4230,7690) v1(4230,7720) ; v1(4330,7750) v1(4440,7750) ; v1(4510,7750) 4510,8480 5160,8480 5160,8490 5350,8490 5350,8560 5420,8560 5420,8790 v1(5160,8790)
USB_DN: J1.A7 J1.B7 U6.6 | length 3120
  Top Layer w8: v1(3250,8110) 3260,8110 v1(3260,8100) ; v1(3860,7090) 3860,7160 4360,7160 4360,7170 4410,7170 v1(4410,7210) ; v1(4430,7680) U6.6@4430,7690
  Bottom Layer w8: v1(3220,8100) 3220,8110 v1(3250,8110) ; v1(3260,8100) 3260,6950 3580,6950 3580,7090 v1(3860,7090) ; v1(4410,7210) 4410,7640 4430,7640 v1(4430,7680)
USB_DP: J1.A6 J1.B6 U6.5 | length 80
  Top Layer w8: J1.A6@3240,8100 3240,8080 3270,8080 3270,8100 J1.B6@3280,8100
VBAT: C12.1 U4.5 U5.3 U7.5 | length 3150
  Top Layer w14: v1(3590,8020) 3590,8000 3600,8000 3600,7790 3820,7790 v1(3820,7930) ; U7.5@3850,8350 3860,8350 v1(3860,8360)
  Bottom Layer w14: v1(3370,7400) 3370,8040 3590,8040 v1(3590,8020) ; v1(3820,7930) 3820,8310 3810,8310 3810,8900 3890,8900 3890,8880 3900,8880 3900,8360 v1(3860,8360)
VBUS: C6.1 C11.1 J1.A4 J1.A9 J1.B4 J1.B9 U4.4 | length 3660
  Top Layer w14: J1.A4@3150,8100 3160,8100 3160,8320 3230,8320 3230,8310 3240,8310 3240,8140 3310,8140 3310,8130 3320,8130 3320,8120 3330,8120 3330,8100 v1(3350,8100) ; v1(3310,8070) 3310,8020 v1(3390,8020) ; C11.1@3420,7200 3420,6980 3480,6980 3480,6990 3490,6990 3490,7930 U4.4@3570,7930 ; v1(3570,7940) U4.4@3570,7930 ; v1(3590,7920) 3590,7930 U4.4@3570,7930
  Bottom Layer w14: v1(3310,8070) 3310,8110 3350,8110 v1(3350,8100) 3350,8060 3600,8060 3600,8050 3610,8050 3610,7800 3830,7800 3830,7780 3590,7780 v1(3590,7920) ; v1(3390,8020) 3390,7940 v1(3570,7940)
  other v1: 3350,8100
VMID: C4.1 U2.24 | length 250
  Top Layer w8: U2.24@3880,8890 3900,8890 3900,8910 3920,8910 C4.1@3920,9100
pads on no net: DS1.1 DS1.2 DS1.3 DS1.4 DS1.5 DS1.6 DS1.7 J1.1@3079.92,8069.46 J1.1@3420.07,7904.9 J1.1@3420.07,8069.46 J1.A8 J1.B8 K1.3 K1.4 K1.5 LS1.3 U1.4 U1.5 U1.6 U1.7 U1.14 U1.17 U1.18 U1.19 U1.20 U1.21 U1.22 U1.24 U1.27 U1.32 U2.2 U2.3 U2.4 U2.9 U2.10 U2.11 U2.12 U2.13 U2.14 U2.15 U2.20 U2.21 U2.31 U6.7 U6.8 U6.9 U6.10 U6.11 U6.12 U6.13 U6.14 U6.15 U7.4

## Polygon pours and split planes (outlines as drawn)
GND on Bottom Layer (solid, pour order 4): 3030,6180 3030,3090 7694,3090 7694,6180
GND on Top Layer (solid, pour order 0): 3030,6180 3030,3090 7694,3090 7694,6180

## Keep-outs
Board Outline Layer:
  region: 4410,9280 4410,9160 5190,9160 5190,9280
  region: 7300,8450 7300,7050 7680,7050 7680,8450
  lines w10: 3000,3000 3000,6150 7724,6150 7724,3000 3000,3000

## Text inside footprints (layer, text, board x,y; h text height)
DS1: Top Silkscreen Layer "CS" at 4055.05,6702.36 h39.37 r90; Top Silkscreen Layer "RES" at 3858.25,6663.12 h39.37 r90; Top Silkscreen Layer "D1" at 3754.95,6720.27 h39.37 r90; Top Silkscreen Layer "DC" at 3956.65,6702.36 h39.37 r90; Top Silkscreen Layer "D0" at 3651.55,6702.36 h39.37 r90; Top Silkscreen Layer "VCC" at 3553.15,6663.12 h39.37 r90; Top Silkscreen Layer "GND" at 3454.65,6663.12 h39.37 r90